# Altium PCB POD-Design-v1.1.PcbDoc (part 6 of 7)
Units mil, origin at the board's own origin, x right, y up, seen from the top; angles counter-clockwise.
Board outline 5511.81 x 3937.01 mil, 4 copper layers (Top Layer, Layer 1, Layer 2, Bottom Layer), stack 61.653 mil thick; 308 components, 227 nets, 905 pads, 367 vias.
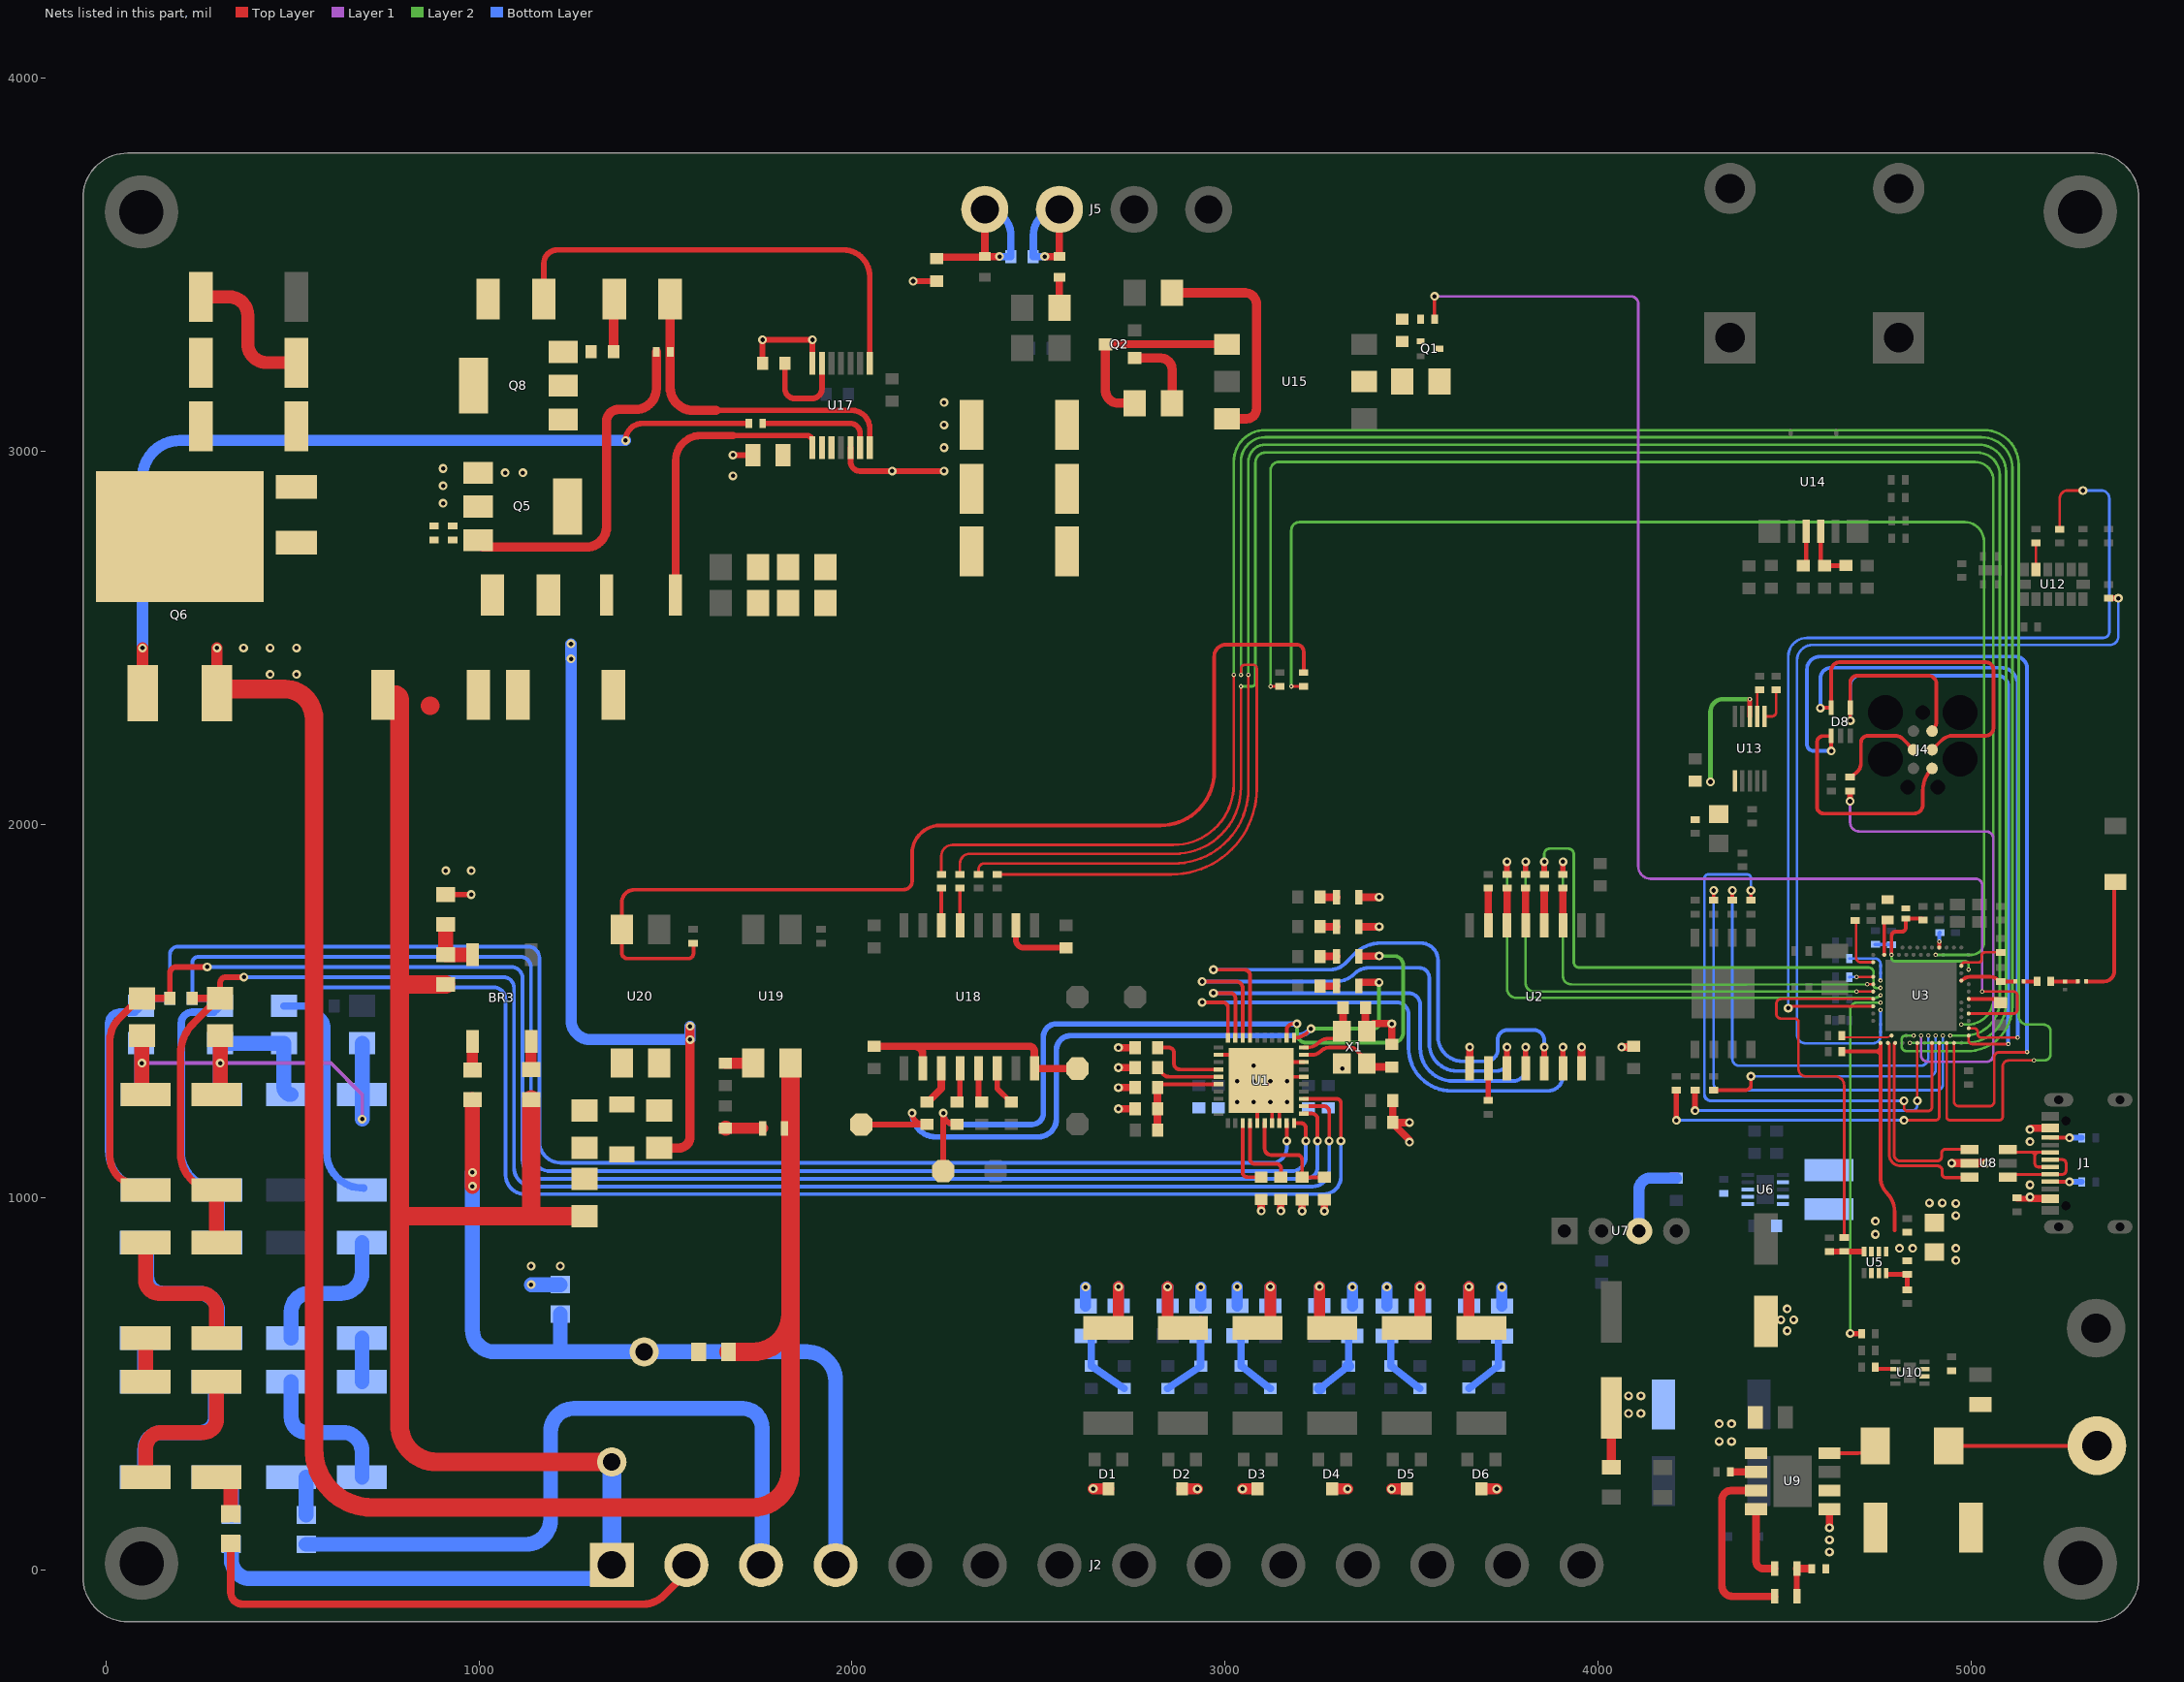
[diagram p5: the nets of this part, all layers, seen from the top]

## Via types
v1: diameter 23.62, hole 11.81, Top Layer to Bottom Layer, tented both sides, 332 vias
v2: diameter 11.81, hole 5.91, Top Layer to Bottom Layer, tented both sides, 34 vias
v3: diameter 15.75, hole 5.91, Top Layer to Bottom Layer, tented both sides, 1 vias

## Nets (pads, with @x,y where several pads share a name; then routed paths per layer and width w, separated by ;. In a path a pad name is that pad's centre, name@x,y a point inside that pad or via, vN(x,y) a via of type N, cw(c..) or ccw(c..) an arc to the next point about the centre after c; other vN are vias at no path point) (continued)
INN1: R25.1 U1.14 | length 217.2
  Top Layer w10: U1.14@3066.97,1199.03 3066.97,1102.44 ccw(c3079.41,1102.44) 3079.41,1090 3138.52,1090 cw(c3138.52,1078.62) 3149.9,1078.62 R25.1@3149.9,1054.5
INP1: R24.2 U1.13 | length 188.7
  Top Layer w10: U1.13@3047.29,1199.03 3047.29,1067.13 ccw(c3059.92,1067.13) 3059.92,1054.5 R24.2@3096.91,1054.5
IRQ0: R166.2 U18.14 | length 99.6
  Top Layer w10: U18.14@2239.49,1729.37 R166.2@2239.49,1828.94
IRQ0_1: LED3.2 R162.1 TP3.1 U1.31 | length 1985.3
  Top Layer w10: U1.31@3185.08,1427.97 ccw(c3185.08,1478.81) 3221.01,1442.85 v1(3230.67,1452.51) ; LED3.2@3358.52,1566.75 LED3.2@3359.39,1567.62
  Top Layer w15: TP3.1@2025,1195.67 R162.1@2200.78,1195.67 ; v1(2161.29,1226.18) ccw(c2191.29,1226.18) 2191.29,1196.18 R162.1@2201.3,1196.18
  Top Layer w20: LED3.2@3361.31,1576.54 v1(3412.74,1576.54)
  Layer 2 w10: v1(3230.67,1452.51) 3399.28,1452.51 ccw(c3399.28,1465.96) 3412.74,1465.96 v1(3412.74,1576.54)
  Bottom Layer w15: v1(2161.29,1226.18) ccw(c2225.22,1226.18) 2225.22,1162.25 2499.55,1162.25 ccw(c2499.55,1210.7) 2548,1210.7 2548,1395 cw(c2587,1395) 2587,1434 3193.44,1434 ccw(c3193.44,1479.19) 3225.39,1447.23 v1(3230.67,1452.51)
IRQ1: R167.2 U18.13 | length 99.6
  Top Layer w10: U18.13@2289.49,1729.37 R167.2@2289.49,1828.94
IRQ1_1: LED4.2 R163.1 TP4.1 U1.32 | length 2140.3
  Top Layer w10: U1.32@3165.4,1427.97 3165.4,1449.02 cw(c3181.67,1449.02) 3181.67,1465.3 v1(3192.71,1465.3) ; LED4.2@3358.52,1646.17 LED4.2@3359.4,1647.04
  Top Layer w15: TP4.1@2222.3,1071.18 ccw(c2222.3,1093.68) 2244.8,1093.68 v1(2244.8,1226.18) ccw(c2274.8,1226.18) 2274.8,1196.18 R163.1@2281.76,1196.18
  Top Layer w20: LED4.2@3359.4,1647.04 v1(3413.17,1647.04)
  Layer 2 w10: v1(3192.71,1465.3) 3192.71,1439.99 ccw(c3217.61,1439.99) 3217.61,1415.1 3450.63,1415.1 ccw(c3450.63,1442.06) 3477.59,1442.06 3477.59,1623.23 ccw(c3453.78,1623.23) 3453.78,1647.04 v1(3413.17,1647.04)
  Bottom Layer w15: v1(2244.8,1226.18) ccw(c2275.31,1226.18) 2275.31,1195.67 2482.48,1195.67 ccw(c2482.48,1226.18) 2513,1226.18 2513,1430.08 cw(c2548.21,1430.08) 2548.21,1465.3 v1(3192.71,1465.3)
L1_1000_CT_1: C100.2 FB8.2 J5.3 | length 363.5
  Top Layer w20: v1(2516.79,3522) FB8.2@2556.1,3522 J5.3@2556.1,3648.79
  Bottom Layer w20: v1(2516.79,3522) C100.2@2486.1,3522 2486.1,3578.79 cw(c2556.1,3578.79) J5.3@2556.1,3648.79
L1_1000_CT_2: C99.2 C100.1 FB7.2 J5.4 | length 493.2
  Top Layer w20: C99.2@2227.09,3516.32 2231.61,3520.83 FB7.2@2354.93,3520.83 ; J5.4@2356.1,3648.79 FB7.2@2356.1,3522 v1(2395.41,3522)
  Bottom Layer w20: J5.4@2356.1,3648.79 cw(c2356.1,3578.79) 2426.1,3578.79 C100.1@2426.1,3522 v1(2395.41,3522)
MISO: U1.38 U2.11 | length 1422.8
  Top Layer w10: v1(2938.72,1578.73) 3030.38,1578.73 cw(c3030.38,1561.82) 3047.29,1561.82 U1.38@3047.29,1427.97 ; U2.11@3755.75,1345.33 U2.11@3755.93,1345.51
  Top Layer w15: U2.11@3755.93,1345.51 v1(3755.93,1402.98)
  Bottom Layer w10: v1(2938.72,1578.73) 3296.79,1578.73 ccw(c3296.79,1649.97) 3347.17,1599.59 cw(c3386.21,1560.55) 3386.21,1615.76 3520.59,1615.76 cw(c3520.59,1588.74) 3547.62,1588.74 3547.62,1413.58 ccw(c3622.2,1413.58) 3622.2,1339 3729.93,1339 ccw(c3729.93,1364.81) 3755.75,1364.81 ; 3755.93,1364.81 v1(3755.93,1402.98)
MOSI: U1.39 U2.12 | length 1328.2
  Top Layer w10: v1(2968.94,1547.73) 3015.2,1547.73 cw(c3015.2,1535.33) 3027.6,1535.33 U1.39@3027.6,1427.97
  Top Layer w15: U2.12@3805.93,1345.51 v1(3805.93,1402.98)
  Bottom Layer w10: v1(2968.94,1547.73) 3491.44,1547.73 cw(c3491.44,1515.77) 3523.4,1515.77 3523.4,1400.39 ccw(c3611.79,1400.39) 3611.79,1312 3772.42,1312 ccw(c3772.42,1345.51) 3805.93,1345.51 v1(3805.93,1402.98)
NetANT1_1: ANT1.1 L4.2 | length 332.6
  Top Layer w10: L4.2@5308.14,1578.88 5355.88,1578.88 ccw(c5355.88,1607) 5384,1607 5384,1843.02 cw(c5387,1843.02) ANT1.1@5387,1846.02
NetBR3_2: BR3.2 R134.2 R135.2 | length 144.7
  Top Layer w40: R134.2@911,1650.81 R135.2@911,1732 ; R134.2@916,1650.81 916.6,1650.21 BR3.2@979.25,1650.21
NetBR3_3: BR3.3 R133.2 | length 76.5
  Top Layer w30: R133.2@982.52,1342.06 BR3.3@982.52,1418.52
NetBR3_4: BR3.4 R132.2 | length 75.9
  Top Layer w30: R132.2@1140,1342.67 BR3.4@1140,1418.52
NetC1_2: C1.2 R1.2 R2.1 | length 187.4
  Bottom Layer w20: C1.2@2641.16,628.79 2641.17,618.79 2641.17,553.28 R1.2@2641.17,548.28 2648.67,543.28 2722.08,493.28 R2.1@2729.58,488.28
NetC3_1: C3.1 R5.2 R6.1 | length 187.4
  Bottom Layer w20: R6.1@2846.16,487.77 2853.66,492.77 2927.08,542.76 R5.2@2934.58,547.76 2934.58,552.76 2934.58,618.28 C3.1@2934.58,628.28
NetC5_2: C5.2 R9.2 R10.1 | length 184.1
  Bottom Layer w20: C5.2@3033.16,629.41 3043.16,619.41 R9.2@3043.16,548.27 3050.66,543.27 3114.08,493.28 R10.1@3121.58,488.28
NetC7_1: C7.1 R13.2 R14.1 | length 180.3
  Bottom Layer w20: R14.1@3255.67,488.28 R13.2@3329.07,547.25 ; R13.2@3331.57,547.25 C7.1@3331.57,628.39
  Bottom Layer w30: R14.1@3253.17,488.28 R14.1@3255.67,488.28 ; R13.2@3329.07,547.25 R13.2@3331.57,547.25
NetC9_2: C9.2 U1.30 X1.3 | length 176.4
  Top Layer w10: U1.30@3210.97,1402.08 3221.28,1402.08 ccw(c3221.28,1441.92) 3249.45,1413.75 cw(c3278.87,1384.33) 3278.87,1425.94 X1.3@3306.36,1425.94 ; X1.3@3313.03,1445.71 ccw(c3313.03,1449.17) 3316.5,1449.17 X1.3@3313.03,1445.71
  Top Layer w20: X1.3@3316.5,1449.17 C9.2@3316.5,1513.5
NetC10_2: C10.2 U1.29 X1.1 | length 236.6
  Top Layer w10: U1.29@3210.97,1382.4 3233.48,1382.4 ccw(c3233.48,1415.69) 3257.02,1392.15 ; 3257.04,1392.18 cw(c3280.56,1368.62) 3280.56,1401.9 3334.3,1401.9 cw(c3334.3,1375.9) 3352.69,1394.28 X1.1@3363.48,1383.49 ; X1.1@3379.96,1359.09 ccw(c3389.14,1359.09) X1.1@3389.14,1349.91
  Top Layer w20: X1.1@3389.14,1349.91 C10.2@3447.1,1349.91
NetC11_2: C11.2 R15.2 R16.1 | length 179.9
  Bottom Layer w20: C11.2@3444.17,629.42 R15.2@3444.17,548.28 3451.67,543.28 3515.08,493.28 R16.1@3522.58,488.28
NetC13_1: C13.1 R19.2 R20.1 | length 179.3
  Bottom Layer w20: R20.1@3654.16,488.79 3661.66,493.79 3725.08,542.76 R19.2@3732.58,547.76 C13.1@3732.58,628.9
NetC35_2: C35.2 C36.2 C44.1 L1.2 U3.B5 U3.E24 | length 483.6
  Top Layer w10: v2(4786.87,1650.41) 4786.87,1701.68 cw(c4797.46,1701.68) 4797.46,1712.26 4813.78,1712.26 ccw(c4813.78,1723.57) 4825.09,1723.57 L1.2@4825.09,1747.22 4868.04,1747.22 cw(c4868.04,1743.63) C35.2@4871.63,1743.63
  Layer 2 w7: v2(4786.87,1650.41) 4786.87,1641.46 ccw(c4794.94,1641.46) 4794.94,1633.39 4983.66,1633.39 cw(c4983.66,1623.48) 4993.57,1623.48 v2(4993.57,1611.04)
  Bottom Layer w10: C36.2@4743.6,1678.2 4786.87,1678.2 C44.1@4786.87,1677.5 v2(4786.87,1650.41)
NetC37_1: C37.1 U3.A18 | length 40.9
  Top Layer w10: U3.A18@4914.83,1670.09 v2(4914.83,1686.01)
  Bottom Layer w10: v2(4914.83,1686.01) 4914.83,1708.3 cw(c4916.57,1708.3) C37.1@4916.57,1710.05
NetC42_1: C42.1 U3.D23 | length 130.7
  Top Layer w7: U3.D23@4973.88,1620.88 cw(c4982.95,1620.88) 4982.95,1629.95 5020.05,1629.95 ccw(c5020.05,1638.37) 5028.46,1638.37 5028.46,1648.59 cw(c5036.88,1648.59) 5036.88,1657.01 C42.1@5079.62,1657.01
NetC43_2: C43.2 U3.C1 | length 152.4
  Top Layer w7: C43.2@4692,1742.5 4692,1642.46 ccw(c4703.73,1642.46) 4703.73,1630.72 U3.C1@4737.66,1630.72
NetC45_1: C45.1 L3.2 | length 36.4
  Top Layer w10: L3.2@5140.63,1578.87 C45.1@5176.99,1578.87
NetC45_2: C45.2 L4.1 L5.2 | length 72.5
  Top Layer w10: C45.2@5213.99,1578.87 L4.1@5286.49,1578.88
NetC48_2: C48.2 L3.1 U3.H23 | length 151.6
  Top Layer w10: U3.H23@4973.88,1581.51 4982.94,1587.51 ccw(c4973.88,1601.2) 4983.63,1588 cw(c4989.54,1579.92) 4986.06,1589.3 cw(c4997.68,1557.71) 4997.68,1591.37 5051.59,1591.37 cw(c5051.59,1562.35) 5072.11,1582.87 5076.11,1578.87 C48.2@5079.61,1578.87 L3.1@5118.98,1578.87
NetC49_2: C49.2 U3.N24 | length 89.2
  Top Layer w10: U3.N24@4993.57,1532.3 5074.07,1532.3 cw(c5074.07,1526.76) C49.2@5079.61,1526.76
NetC51_2: C51.2 U3.AC5 | length 136.2
  Top Layer w5: C51.2@4653.5,1433.87 4657.66,1429.72 4775.26,1429.72 ccw(c4775.26,1443.91) 4785.3,1433.87 U3.AC5@4786.87,1433.87
NetC60_2: C60.2 U6.6 U6.7 U6.8
NetC69_2: C69.2 C70.2 FB6.1 U13.1 U13.8 | length 359
  Top Layer w12: U13.8@4406.71,2289.37 v2(4406.71,2335.72)
  Layer 2 w12: v1(4301.42,2114.02) 4301.42,2302.36 cw(c4334.78,2302.36) 4334.78,2335.72 v2(4406.71,2335.72)
NetC72_1: C72.1 R84.2 R85.2 | length 158.7
  Top Layer w25: R84.2@4035.43,276.85 C72.1@4035.43,435.51
  other v1: 4081.76,421 4115,421 4081.76,468.24 4115,468.24
NetC75_2: C75.2 U14.3 | length 95.4
  Top Layer w10: C75.2@4549.67,2693.59 C75.2@4557.91,2701.83
  Top Layer w12: C75.2@4557.91,2701.83 U14.3@4557.91,2785.6
NetC77_2: C77.2 R88.2 U14.4 | length 152.3
  Top Layer w10: C77.2@4597.28,2702.11 ccw(c4613.04,2702.11) C77.2@4601.89,2690.96 ; C77.2@4607.98,2693.58 C77.2@4608.02,2693.62
  Top Layer w12: C77.2@4597.28,2702.11 U14.4@4597.28,2785.6 ; C77.2@4608.02,2693.62 R88.2@4664.35,2693.62
NetC103_2: C103.2 U17.6 | length 267.4
  Top Layer w15: C103.2@1821.49,3234.36 ccw(c1820,3234.36) C103.2@1820,3235.85 1820,3168.37 ccw(c1846.8,3168.37) 1846.8,3141.57 1892.68,3141.57 ccw(c1892.68,3168.37) 1919.48,3168.37 U17.6@1919.48,3235.85
NetC104_2: C104.2 R158.1 R171.1 U17.9 U17.10
NetD11_1: D11.1 Q6.2
NetD11_2: D11.2 R146.2
NetD16_1: D16.1 D17.1 Q8.2 Q8.4
NetD18_1: D18.1 R141.1 | length 142.5
  Top Layer w20: D18.1@1361,3406.28 cw(c1362.86,3406.28) D18.1@1362.86,3408.14
  Top Layer w25: R141.1@1361,3266.69 D18.1@1361,3406.28
NetD19_1: D19.1 R176.1 R177.1
NetD19_2: D19.2 R178.1 U20.2
NetFB1_2: FB1.2 R30.1 | length 101.3
  Bottom Layer w40: FB1.2@336.39,148.82 R30.1@336.39,250.08
NetFB2_2: FB2.2 R36.1 | length 101.4
  Top Layer w15: R36.1@296.39,250.08 cw(c296.39,244.89) R36.1@301.58,244.89
  Top Layer w40: FB2.2@334.58,151.68 R36.1@334.58,244.89
NetFB3_2: FB3.2 R42.1 | length 101.3
  Bottom Layer w40: FB3.2@536.52,148.82 R42.1@536.52,250.08
NetFB8_1: FB8.1 R137.2 | length 82
  Top Layer w20: R137.2@2556.1,3384.93 FB8.1@2556.1,3466.89
NetJ4_3: J4.3 R91.1 | length 270.9
  Top Layer w10: R91.1@4675.62,2126.62 4683.12,2130.62 4695.11,2141.38 ccw(c4675.62,2163.13) 4704.83,2163.13 4704.83,2219.18 cw(c4723.37,2219.18) 4723.37,2237.73 4796,2237.73 cw(c4796,2208.72) 4816.51,2229.23 J4.3@4845.61,2200.13
NetL1_1: L1.1 L2.2
NetL2_1: L2.1 U3.B3 | length 97
  Top Layer w10: U3.B3@4767.19,1650.41 4767.19,1734.42 L2.1@4776.4,1743.63
NetL6_1: L6.1 U6.4
NetL6_2: L6.2 U6.2
NetL7_1: L7.1 U9.8 | length 128.3
  Top Layer w10: U9.8@4620.33,314.41 4696.14,314.41 ccw(c4696.14,381.21) L7.1@4743.38,333.98
NetLED1_1: LED1.1 R26.1 | length 44.9
  Top Layer w20: R26.1@3254.56,1725.58 LED1.1@3299.47,1725.58
NetLED2_1: LED2.1 R27.1 | length 44.9
  Top Layer w20: R27.1@3254.56,1804.99 LED2.1@3299.47,1805
NetLED3_1: LED3.1 R28.1 | length 44.9
  Top Layer w20: R28.1@3254.56,1566.75 LED3.1@3299.47,1566.75
NetLED4_1: LED4.1 R29.1 | length 44.9
  Top Layer w20: R29.1@3254.56,1646.16 LED4.1@3299.47,1646.17
NetLED5_1: LED5.1 LED6.1 R73.2 | length 108.3
  Top Layer w15: LED5.1@4532.78,-69.32 LED6.1@4532.78,5
  Top Layer w20: LED6.1@4532.78,5 R73.2@4566.75,5
NetLED5_2: LED5.2 U9.3 | length 493.8
  Top Layer w20: U9.3@4423.68,214.41 4356.95,214.41 ccw(c4356.95,189.67) 4332.21,189.67 4332.21,-40.74 ccw(c4360.79,-40.74) 4360.79,-69.32 LED5.2@4473.73,-69.32
NetLED6_2: LED6.2 U9.4 | length 201
  Top Layer w20: U9.4@4423.68,164.41 4423.68,24.69 ccw(c4443.37,24.69) 4443.37,5 LED6.2@4473.73,5
NetLED7_1: LED7.1 R173.2 | length 99.7
  Top Layer w30: R173.2@1661.5,1185.15 LED7.1@1760.47,1185.15
  Top Layer w40: R173.2@1660.99,1185.66 R173.2@1661.5,1185.15
NetQ1_1: Q1.1 R98.1
NetQ1_3: Q1.3 R100.1
NetQ2_1: Q2.1 R101.2 R102.1 | length 208
  Top Layer w25: Q2.1@2758,3249.84 2828,3249.84 cw(c2828,3219.84) 2858,3219.84 R101.2@2858,3129
NetQ2_3: Q2.3 R101.1 U15.4 | length 547.4
  Top Layer w20: Q2.3@2679.26,3287.25 U15.4@3004.91,3287.25
  Top Layer w25: Q2.3@2679.26,3287.25 2679.26,3164.52 ccw(c2714.78,3164.52) 2714.78,3129 R101.1@2758,3129
NetQ5_2: Q5.2 Q5.4 Q8.1
NetQ6_1: Q6.1 R147.2 | length 2284.5
  Top Layer w15: v1(1393,3029) cw(c1439,3029) 1439,3075 R147.2@1723.5,3075
  Top Layer w30: Q6.1@98,2353.34 v1(98,2473)
  Bottom Layer w30: v1(98,2473) 98,2929 cw(c198,2929) 198,3029 v1(1393,3029)
NetR7_2: R7.2 U1.4 | length 208.7
  Top Layer w10: R7.2@2819.01,1401.7 2849.29,1401.7 cw(c2849.29,1388.04) 2862.95,1388.04 2862.95,1359.58 ccw(c2879.49,1359.58) 2879.49,1343.03 U1.4@2982.03,1343.03
NetR8_2: R8.2 U1.5 | length 173.3
  Top Layer w10: R8.2@2819.01,1348.16 2829.01,1335.66 2831.61,1332.47 ccw(c2850.84,1348.16) 2850.84,1323.34 U1.5@2982.03,1323.34
NetR21_2: R21.2 U2.7 | length 97.6
  Top Layer w20: U2.7@3705.93,1729.37 R21.2@3705.93,1826.98
NetR22_1: R22.1 U2.10 | length 85.6
  Top Layer w15: R22.1@3705.93,1259.94 U2.10@3705.93,1345.51
NetR30_2: R30.2 R31.1 | length 408.8
  Bottom Layer w40: R31.1@103.99,250.08 103.99,324.42 cw(c149.57,324.42) 149.57,370 253.02,370 ccw(c253.02,410.96) 293.99,410.96 R30.2@293.99,505.99
NetR31_2: R31.2 R32.1 | length 117.1
  Bottom Layer w40: R31.2@103.99,505.99 R32.1@103.99,623.05
NetR32_2: R32.2 R33.1 | length 405.6
  Bottom Layer w40: R32.2@109.37,878.96 109.37,787.94 ccw(c154.34,787.94) 154.34,742.97 250.38,742.97 cw(c250.38,693.99) 299.37,693.99 R33.1@299.37,623.05
NetR36_2: R36.2 R37.1 | length 412.2
  Top Layer w40: R37.1@106.39,250.08 106.39,326.39 cw(c150,326.39) 150,370 261.39,370 ccw(c261.39,405) 296.39,405 R36.2@296.39,505.99
NetR37_2: R37.2 R38.1 | length 117.1
  Top Layer w40: R37.2@106.39,505.99 R38.1@106.39,623.05
NetR38_2: R38.2 R39.1 | length 412.2
  Top Layer w40: R38.2@106.39,878.96 106.39,777.97 ccw(c141.39,777.97) 141.39,742.97 252.78,742.97 cw(c252.78,699.36) 296.39,699.36 R39.1@296.39,623.05
NetR42_2: R42.2 R43.1 | length 405.7
  Bottom Layer w40: R42.2@496.52,505.99 496.52,411.54 ccw(c538.06,411.54) 538.06,370 634.5,370 cw(c634.5,317.98) 686.52,317.98 R43.1@686.52,250.08
NetR43_2: R43.2 R44.1 | length 117.1
  Bottom Layer w40: R43.2@686.52,505.99 R44.1@686.52,623.05
NetR44_2: R44.2 R45.1 | length 400.6
  Bottom Layer w40: R45.1@496.52,623.05 496.52,693.99 cw(c545.5,693.99) 545.5,742.97 629.97,742.97 ccw(c629.97,799.52) 686.52,799.52 R44.2@686.52,878.96
NetR68_1: R68.1 R69.2 U5.4 | length 99.8
  Top Layer w9: U5.4@4772.53,797.3 4772.53,795.53 U5.4@4774.33,793.74
  Top Layer w12: U5.4@4774.33,793.74 R68.1@4828.83,793.74 R69.2@4828.82,752.74
NetR74_1: R74.1 U9.6
NetR75_2: R75.2 U9.2 | length 64.2
  Top Layer w20: R75.2@4359.44,264.41 U9.2@4423.68,264.41
NetR77_2: R77.2 U10.6 | length 53.7
  Top Layer w10: R77.2@4743.38,540.15 U10.6@4797.05,540.15
NetR80_2: R80.2 U12.12 | length 71.5
  Top Layer w7: U12.12@5174.02,2683.11 R80.2@5174.02,2754.64
NetR81_2: R81.2 U13.6 | length 96.9
  Top Layer w7: U13.6@4446.08,2289.37 4465.13,2289.37 ccw(c4465.13,2302.07) 4477.83,2302.07 R81.2@4477.83,2359.93
NetR83_2: R83.2 U13.7 | length 71.3
  Top Layer w7: U13.7@4426.39,2289.37 R83.2@4426.39,2360.69
NetR99_1: R99.1 U15.6 | length 619
  Top Layer w25: R99.1@2858,3425 3054.03,3425 cw(c3054.03,3394.7) 3084.33,3394.7 3084.33,3114.03 cw(c3057.54,3114.03) 3057.54,3087.25 U15.6@3004.91,3087.25
NetR100_2: R100.2 U15.2
NetR102_2: R102.2 R103.1
NetR103_2: R103.2 R104.1
NetR139_2: R139.2 R140.1
NetR144_2: R144.2 R145.1 | length 389.3
  Top Layer w35: R144.2@254.48,3414 330.48,3414 cw(c330.48,3364.13) 380.36,3364.13 380.36,3288.67 ccw(c431.02,3288.67) 431.02,3238 509.38,3238 cw(c509.38,3237) R145.1@510.38,3237
NetR145_2: R145.2 R146.1
NetR147_1: R147.1 U17.13 | length 314.9
  Top Layer w15: R147.1@1760.5,3075 1994.84,3075 cw(c1994.84,3048) 2021.84,3048 U17.13@2021.84,3009.86
NetR158_2: R158.2 R170.1
NetR161_2: R161.2 U18.10 | length 186.2
  Top Layer w15: U18.10@2439.49,1729.37 2439.49,1689.9 ccw(c2460.01,1689.9) 2460.01,1669.37 R161.2@2574.49,1669.37
NetR162_2: R162.2 U18.3 | length 106.6
  Top Layer w20: R162.2@2201.3,1256.18 2203.8,1256.18 2239.49,1291.87 U18.3@2239.49,1345.51
NetR163_2: R163.2 U18.4 | length 92.7
  Top Layer w15: R163.2@2281.76,1256.18 2281.99,1256.18 2289.49,1263.68 U18.4@2289.49,1345.51
NetR164_2: R164.2 U18.5 | length 92.7
  Top Layer w15: U18.5@2339.49,1345.51 2339.49,1263.68 2346.99,1256.18 R164.2@2347.22,1256.18
NetR165_2: R165.2 U18.6 | length 106.6
  Top Layer w15: U18.6@2389.49,1345.51 2389.49,1291.87 2425.17,1256.18 R165.2@2427.67,1256.18
NetR171_2: R171.2 R172.1
NetR174_2: R174.2 U19.1 | length 74
  Top Layer w30: R174.2@1660.99,1360.28 U19.1@1735,1360.28
NetR177_2: R177.2 U20.1
NEUTRAL: FB4.1 J2.4 R133.1 R138.1 RV3.1 | length 2301
  Top Layer w40: v1(982.52,1030) v1(982.52,1067) R133.1@982.52,1262.06
  Bottom Layer w40: v1(982.52,1067) v1(982.52,1030) 982.52,644.48 ccw(c1040.8,644.48) 1040.8,586.2 1218.08,586.2 ; FB4.1@1218.08,687.6 1218.08,586.2 ; J2.4@1956.1,14.82 1956.1,508.92 ccw(c1878.83,508.92) 1878.83,586.2 RV3.1@1442.72,586.2 1218.08,586.2
NGND: C1.1 C2.1 C3.2 C4.2 C5.1 C6.1 C7.2 C8.2 C9.1 C10.1 C11.1 C12.1 C13.2 C14.2 C16.1 C17.1 C18.1 C19.1 C20.1 C21.1 C22.1 C23.1 C24.1 C25.1 C27.1 C28.1 C30.1 C31.1 C33.1 C34.1 C62.1 C111.1 D1.3 D2.3 D3.3 D4.3 D5.3 D6.3 FB4.2 LED1.2 LED2.2 R3.1 R4.2 R7.1 R8.1 R11.1 R12.2 R17.1 R18.2 R24.1 R25.2 R34.1 R35.1 R40.1 R41.1 R46.1 R47.1 SB1.1 TP9.1 U1.2 U1.15 U1.17 U1.18 U1.26 U1.28 U1.41 U2.9 U2.15 U7.3 U18.2 U18.8 X1.2 X1.4 | length 6108.4
  Top Layer w10: U1.2@2982.03,1382.4 3027.6,1382.4 cw(c3027.6,1313.5) U1.41@3096.5,1313.5 ; U1.41@3082.12,1287.44 cw(c3082.12,1282.9) 3086.66,1282.9 U1.15@3086.66,1199.03 ; U1.17@3126.03,1199.03 3126.03,1261.53 cw(c3128.36,1261.53) U1.41@3128.36,1263.86 ; U1.18@3145.71,1199.03 U1.41@3145.71,1264.29 ; U1.26@3210.97,1323.34 3106.34,1323.34 ccw(c3106.34,1313.5) U1.41@3096.5,1313.5 ; U1.28@3210.97,1362.71 3145.71,1362.71 ccw(c3145.71,1313.5) U1.41@3096.5,1313.5
  Top Layer w20: C111.1@2059.49,1405.51 2167.33,1405.51 ; U18.2@2189.49,1345.51 2189.49,1383.36 ccw(c2167.33,1383.36) 2167.33,1405.51 ; TP9.1@2604.49,1345.51 U18.8@2489.49,1345.51 2489,1345.51 2489,1391 ccw(c2474.49,1391) 2474.49,1405.51 2167.33,1405.51 ; v1(2714.35,1237.5) SB1.1@2759.01,1237.5 ; v1(2714.35,1294.62) C17.1@2759.01,1294.62 ; v1(2714.35,1348.16) R8.1@2759.01,1348.16 ; v1(2714.35,1401.7) R7.1@2759.01,1401.7 ; v1@3096.91,964 R24.1@3096.91,994.5 ; v1@3149.9,964 R25.2@3149.9,994.5 ; v1@3206.56,963.53 C22.1@3206.56,994.03 ; v1(3266.56,963.53) C23.1@3266.56,994.03 cw(c3266.56,992.61) C23.1@3267.98,992.61 ; X1.4@3313.03,1359.09 3313.03,1346.51 v1(3313.98,1345.56) ; LED1.2@3358.52,1725.58 v1(3413.17,1725.58) ; LED2.2@3358.52,1805 v1(3413.17,1804.99) ; C9.1@3376.5,1508.5 3376.5,1449.17 ccw(c3379.96,1449.17) X1.2@3379.96,1445.71 ; X1.2@3379.96,1447.38 3398.54,1465.96 v1@3446.53,1465.96 ; C10.1@3447.1,1409.91 v1(3447.1,1465.39) ; C21.1@3449.99,1200.65 v1(3494.47,1200.65) ; C20.1@3450,1260 3450,1204.57 3454.99,1199.57 3454.99,1193.15 3493.78,1154.36 3493.78,1149 v1(3494.47,1148.31) ; U2.9@3655.93,1345.51 3656,1345.51 v1(3656,1402.98) ; U2.15@3955.93,1345.51 3955.93,1402.98 v1(3956,1402.98) ; v1(4063.21,1402.81) 4063.9,1403.5 4093.5,1403.5 C16.1@4095,1405
  Top Layer w30: v1(2646.77,219.07) 2646.93,218.91 D1.3@2687.58,218.91 D1.3@2687.74,218.75 ; R3.1@2687.58,650.58 2698.09,650.58 2714.58,667.07 v1(2714.58,760.63) ; v1(2846.17,760.63) 2846.17,667.07 2862.67,650.58 R4.2@2887.58,650.58 2918.08,650.58 R4.2@2934.58,667.07 ; D2.3@2885.01,219.07 D2.3@2885.17,218.91 2925.82,218.91 v1(2925.98,218.75) ; v1(3046.76,218.75) 3046.92,218.91 D3.3@3087.58,218.91 D3.3@3087.74,219.07 ; R11.1@3087.58,650.58 3105.09,650.58 3121.58,667.07 v1(3121.58,760.63) ; v1(3253.17,761.26) 3253.17,667.07 3269.67,650.58 R12.2@3287.58,650.58 ; D4.3@3287.41,219.06 D4.3@3287.57,218.9 3328.22,218.9 v1(3328.38,218.74) ; v1(3446.77,218.75) 3446.93,218.91 D5.3@3487.58,218.91 D5.3@3487.74,219.07 ; R17.1@3487.58,650.58 3506.08,650.58 3522.58,667.07 v1(3522.58,760.63) ; v1(3654.17,760.63) 3654.17,667.07 3670.67,650.58 R18.2@3687.58,650.58 ; D6.3@3687.41,219.07 D6.3@3687.57,218.91 3728.22,218.91 v1(3728.38,218.75)
  Top Layer w40: C31.1@96.39,1433.71 v1(96.39,1360) 96.39,1285.95 ccw(c106.39,1285.95) R41.1@106.39,1275.95 ; R40.1@296.39,1275.95 ccw(c296.39,1280.95) R40.1@301.39,1280.95 ; C30.1@301.39,1428.88 cw(c306.39,1428.88) C30.1@306.39,1433.88 ; R40.1@306.39,1280.95 v1(306.39,1360) C30.1@306.39,1428.88
  Layer 1 w10: v1(96.39,1360) v1(306.39,1360) 602.94,1360 687.07,1275.87 v1(687.07,1210)
  Bottom Layer w30: C1.1@2626.16,708.79 v1(2626.16,760) ; C2.1@2714.58,709.42 v1(2714.58,760.63) ; C4.2@2846.17,709.42 v1(2846.17,760.63) ; C3.2@2934.58,708.79 v1(2934.58,760) ; C5.1@3033.16,709.41 v1(3033.16,760.63) ; C6.1@3121.58,709.42 v1(3121.58,760.63) ; C8.2@3253.17,710.05 v1(3253.17,761.26) ; C7.2@3341.58,708.79 v1(3341.58,760) ; C11.1@3434.17,708.79 v1(3434.17,760) ; C12.1@3522.58,709.42 v1(3522.58,760.63) ; C14.2@3654.17,709.42 v1(3654.17,760.63) ; C13.2@3742.58,708.28 v1(3742.58,759.49) ; U7.3@4110,910 4110,1021.77 cw(c4140,1021.77) 4140,1051.77 C62.1@4210,1051.77
  Bottom Layer w40: C28.1@96.39,1413.38 v1(96.39,1360) 96.39,1285.95 ccw(c106.39,1285.95) R35.1@106.39,1275.94 ; R34.1@299.37,1275.95 306.39,1282.97 v1(306.39,1360) C27.1@306.36,1413.38 ; C27.1@306.36,1413.38 C34.1@477.07,1413.38 477.07,1295.4 ccw(c496.52,1295.4) R46.1@496.52,1275.95 ; v1(687.07,1210) 687.07,1275.6 R47.1@686.52,1276.15 687.07,1276.69 C33.1@687.07,1413.38 ; v1(1140,766.34) FB4.2@1218.08,766.34
  other v1: 1140,816 1218.08,816 3097,964 3150,964 3206.66,963.53 3032,1256.09 3076.79,1256.09 3121.58,1256.09 3166.36,1256.09 3032,1312.18 3076.79,1312.27 3121.58,1312.18 3166.36,1312.27 3076.79,1352.8
NTRL: C99.1 C101.1 C103.1 C104.1 LED7.2 Q5.1 Q6.3 R104.2 R135.1 R138.2 R142.1 U17.7 U17.12 U19.2 | length 5990.3
  Top Layer w15: R135.1@911,1812 v1(979.25,1812) ; v1(1681,2989.86) C104.1@1735,2989.86 ; C103.1@1758.5,3237.35 ccw(c1760,3237.35) C103.1@1760,3235.85 v1(1760,3299) v1(1893.89,3299) ; U17.7@1893.89,3235.85 v1(1893.89,3299) ; 1893.89,3281.11 v1(1893.89,3299) ; U17.12@1996.25,3009.86 1996.25,2972.59 ccw(c2021.84,2972.59) 2021.84,2947 v1(2107.67,2947) v1(2247,2947) ; v1@2164,3457 v1(2164,3456.32) C99.1@2227.09,3456.32
  Top Layer w30: Q6.3@298,2306 Q6.3@298,2351.55 v1(298,2473)
  Top Layer w50: Q6.3@298,2351.55 cw(c309.45,2351.55) 309.45,2363 478.44,2363 cw(c478.44,2283.68) 557.77,2283.68 557.77,324.75 ccw(c713.52,324.75) 713.52,169 1735,169 ccw(c1735,269) 1835,269 1835,732.36 ; R138.2@1669.02,586.2 1735,586.2 ccw(c1735,686.2) 1835,686.2 1835,732.36 ; U19.2@1835,1360.28 1835,732.36
  other v1: 911,1876 979.25,1876 440,2402 511,2402 369,2473 440,2473 511,2473 904,2861 904,2907.5 1681,2934 1070,2942.69 1117.51,2942.69 904,2954 2247,3009.86 2247,3070.43 2247,3131
P0.04: R57.1 U3.J1 | length 1185.2
  Top Layer w7: v2(4721.75,1571.67) U3.J1@4737.66,1571.67
  Top Layer w15: R57.1@3905.93,1865.94 v1(3905.93,1900)
  Layer 2 w7: v1(3905.93,1900) 3905.93,1593.04 ccw(c3927.3,1593.04) 3927.3,1571.67 4251.59,1570.29 4398.41,1570.29 v2(4721.75,1571.67) v2@4721.97,1571.67
P0.05: R58.1 U3.K2 | length 1317
  Top Layer w15: R58.1@3855.93,1865.92 v1(3855.93,1900)
  Layer 2 w7: v1(3855.93,1900) 3855.93,1920.93 cw(c3870,1920.93) 3870,1935 3920,1935 cw(c3920,1920) 3935,1920 3935,1630.98 ccw(c3949.76,1630.98) 3949.76,1616.22 4725.57,1616.22 cw(c4725.57,1603.04) 4738.75,1603.04 4738.75,1569.27 ccw(c4746.83,1569.27) 4746.83,1561.18 4757.35,1561.18 v2(4757.35,1561.83)
P0.06: R59.1 U3.L1 | length 1304.3
  Top Layer w7: v2(4693.43,1551.98) U3.L1@4737.66,1551.98
  Top Layer w15: R59.1@3805.93,1865.93 v1(3805.93,1900)
  Layer 2 w7: v1(3805.93,1900) 3805.93,1574.07 ccw(c3828.02,1574.07) 3828.02,1551.98 v2(4693.43,1551.98)
P0.07: R60.1 U3.M2 | length 1391.4
  Top Layer w15: R60.1@3755.93,1865.94 v1(3755.93,1900)
  Layer 2 w7: v1(3755.93,1900) 3755.93,1560.41 ccw(c3781.21,1560.41) 3781.21,1535.13 4740.43,1535.13 ccw(c4740.43,1559.06) 4749.16,1536.78 ccw(c4746.57,1543.29) 4749.76,1537.05 cw(c4757.35,1522.46) 4751.14,1537.69 ccw(c4748.46,1544.16) 4751.71,1537.96 ccw(c4740.43,1559.06) v2(4757.35,1542.14)
P0.08: R61.1 U3.N1 | length 1047.4
  Top Layer w7: R61.1@4660,892.55 4660,1299.91 ccw(c4635.27,1299.91) 4635.27,1324.64 4556.79,1324.64 cw(c4556.79,1343.92) 4537.52,1343.92 4537.52,1469.42 ccw(c4527.29,1469.42) 4527.29,1479.64 4490,1479.64 cw(c4490,1491.64) 4478,1491.64 4478,1519.27 cw(c4491.03,1519.27) 4491.03,1532.3 U3.N1@4737.66,1532.3
P0.15: R168.1 U3.AD10 | length 5578.9
  Top Layer w7: R168.1@2339.49,1865.94 2339.49,1880.49 cw(c2354,1880.49) 2354,1895 2861.95,1895 ccw(c2861.95,2095.78) 3062.73,2095.78 v2(3062.73,2401)
  Layer 2 w7: v2(3062.73,2401) 3062.73,2972.65 cw(c3107.96,2972.65) 3107.96,3017.88 5020.3,3017.88 cw(c5020.3,2944.39) 5093.79,2944.39 5093.79,1519.99 cw(c4987.99,1519.99) 4987.99,1414.19 v2(4836.09,1414.19)
P0.16: R169.1 U3.AC11 | length 5815.5
  Top Layer w7: R169.1@2389.49,1865.94 2855.99,1865.94 ccw(c2855.99,2094.98) 3085.04,2094.98 3085.04,2418.31 ccw(c3075.43,2418.31) 3075.43,2427.91 3053.21,2427.91 ccw(c3053.21,2417.31) 3042.61,2417.31 v2(3042.61,2401)
  Layer 2 w7: v2(3042.61,2401) 3042.61,2972.65 cw(c3107.96,2972.65) 3107.96,3038 5027.48,3038 cw(c5027.48,2954.77) 5110.71,2954.77 5110.71,1513.49 cw(c4989.27,1513.49) 4989.27,1392.05 4826.92,1392.05 cw(c4826.92,1405.02) 4813.95,1405.02 4813.95,1423.36 cw(c4824.47,1423.36) 4824.47,1433.87 v2(4845.93,1433.87)
P0.17: R48.1 U3.AD12 | length 826
  Top Layer w7: v1(4855.77,1259) U3.AD12@4855.77,1414.19
  Top Layer w15: v1(4260,1233) R48.1@4260,1287.64
  Bottom Layer w7: v1(4260,1233) 4842.77,1233 ccw(c4842.77,1246) 4855.77,1246 v1(4855.77,1259)
P0.18/RESET: R91.2 U3.AC13 | length 1339.5
  Top Layer w15: v1(4675.62,2062) R91.2@4675.62,2089.62
  Layer 1 w7: v1(4675.62,2062) 4675.62,2006 ccw(c4700.62,2006) 4700.62,1981 5040.3,1981 cw(c5040.3,1961.45) 5059.85,1961.45 5059.85,1381.94 cw(c5041.64,1381.94) 5041.64,1363.73 4884.41,1363.73 cw(c4884.41,1382.53) 4865.61,1382.53 v2(4865.61,1433.87)
P0.19: R49.1 U3.AC15 | length 1085.6
  Top Layer w10: R49.1@4359.99,1796.64 v1(4360,1823)
  Bottom Layer w7: v1(4360,1823) 4360,1371.63 ccw(c4378.56,1371.63) 4378.56,1353.07 4864.65,1353.07 ccw(c4864.65,1373.71) 4885.3,1373.71 v2(4885.3,1433.87)
P0.20: R50.1 U3.AD16 | length 1629.4
  Top Layer w7: v1(4820.23,1259) 4820.23,1240.16 ccw(c4828.57,1240.16) 4828.57,1231.82 4884.86,1231.82 ccw(c4884.86,1242.1) 4895.14,1242.1 U3.AD16@4895.14,1414.19
  Top Layer w10: R50.1@4409.99,1796.64 v1(4410,1823)
  Bottom Layer w7: v1(4410,1823) 4410,1856 ccw(c4400,1856) 4400,1866 4295.56,1866 ccw(c4295.56,1855.57) 4285.13,1855.57 4285.13,1279.52 ; v1(4820.23,1259) 4305.65,1259 ; 4285.13,1279.52 ccw(c4305.65,1279.52) 4305.65,1259 ; 4285.13,1279.52 4285.13,1275.11 ccw(c4301.23,1275.11) 4301.23,1259 4305.65,1259
P0.21: R51.1 U3.AC17 | length 727.3
  Top Layer w10: R51.1@4309.99,1287.64 4396.92,1287.64 4404.13,1290.72 4408.9,1295.48 ccw(c4396.92,1300.72) 4409.99,1300.72 v1(4409.99,1324.64)
  Bottom Layer w7: v1(4409.99,1324.64) 4887.03,1324.64 ccw(c4887.03,1342.6) 4904.98,1342.6 v2(4904.98,1433.87)
P0.22: R52.1 U3.AD18 | length 988.5
  Top Layer w7: v1(4820.23,1207) 4905.22,1207 ccw(c4905.22,1216.61) 4914.83,1216.61 U3.AD18@4914.83,1414.19
  Top Layer w15: v1(4210.01,1207) R52.1@4210.01,1287.64
  Bottom Layer w7: v1(4210.01,1207) v1(4820.23,1207)
P0.23: R53.1 U3.AC19 | length 1308.4
  Top Layer w10: R53.1@4309.99,1796.64 v1(4310,1823)
  Bottom Layer w7: v1(4310,1823) 4310,1305.46 ccw(c4327.95,1305.46) 4327.95,1287.5 4908.8,1287.5 ccw(c4908.8,1303.37) 4924.67,1303.37 v2(4924.67,1433.87)
P0.24: R166.1 U3.AD20 | length 6302.3
  Top Layer w7: R166.1@2239.49,1865.94 2239.49,1915.49 cw(c2268.97,1915.49) 2268.97,1944.97 2861.33,1944.97 ccw(c2861.33,2107.19) 3023.55,2107.19 v2(3023.55,2401) ; U3.AD20@4934.51,1414.19 4934.51,1215.68 ccw(c4943.19,1215.68) 4943.19,1207 5075.18,1207 ccw(c5075.18,1216.78) 5084.96,1216.78 5084.96,1351.58 cw(c5100.7,1351.58) 5100.7,1367.32 v2(5168.99,1367.32)
  Layer 2 w7: v2(3023.55,2401) 3023.55,2972.65 cw(c3107.96,2972.65) 3107.96,3057.06 3366,3057.06 5034.58,3057.06 cw(c5034.58,2963.97) 5127.67,2963.97 5127.67,1486.79 ccw(c5151.06,1486.79) 5151.06,1463.4 5194.21,1463.4 cw(c5194.21,1444.33) 5213.28,1444.33 5213.28,1384.26 cw(c5196.34,1384.26) 5196.34,1367.32 v2(5168.99,1367.32)
P0.25: R167.1 U3.AC21 | length 5444.8
  Top Layer w7: R167.1@2289.49,1865.94 2289.49,1895 cw(c2315.9,1895) 2315.9,1921.42 2865.5,1921.42 ccw(c2865.5,2098.52) 3042.61,2098.52 v2(3042.61,2370)
  Layer 2 w7: v2(3042.61,2370) 3071.9,2370 ccw(c3071.9,2379.41) 3081.31,2379.41 3081.32,2969.96 cw(c3107.96,2969.96) 3107.96,2996.61 5016.98,2996.61 cw(c5016.98,2936.48) 5077.11,2936.48 5077.11,1527.8 cw(c4983.19,1527.8) 4983.19,1433.87 v2(4944.35,1433.87)
P0.26: R55.1 U3.G1 | length 61.6
  Top Layer w7: v2@4696.07,1591.35 U3.G1@4737.66,1591.35
  Bottom Layer w7: R55.1@4673.72,1590.37 4673.72,1590.71 v2(4693.43,1590.71)
P0.27: R56.1 U3.H2 | length 136.5
  Bottom Layer w7: R56.1@4673.72,1640.74 4742.51,1640.74 cw(c4742.51,1625.91) 4757.35,1625.91 v2(4757.35,1581.51)
P1.01: R92.1 U3.Y23 | length 4097.9
  Top Layer w7: v2(3122,2370) R92.1@3147,2370
  Layer 2 w7: v2(3122,2370) 3122,2948.84 cw(c3144.86,2948.84) 3144.86,2971.69 3345.11,2971.69 5010.01,2971.69 cw(c5010.01,2921.86) 5059.85,2921.86 5059.85,1532.55 cw(c4990.7,1532.55) 4990.7,1463.4 v2(4973.88,1463.4)
P1.04: R95.1 U3.U24 | length 3637.5
  Top Layer w7: U3.U24@4993.57,1492.93 5114.06,1492.93 ccw(c5114.06,1502.77) 5123.9,1502.77 5123.9,1542.14 ccw(c5114.06,1542.14) 5114.06,1551.98 v2(5030,1551.98)
  Top Layer w10: R95.1@3561.61,3354.68 v1(3561.61,3415.73)
  Layer 1 w7: v1(3561.61,3415.73) 4087.27,3415.73 cw(c4087.27,3395) 4108,3395 4108,1886.91 ccw(c4140.51,1886.91) 4140.51,1854.4 5012.21,1854.4 cw(c5012.21,1836.61) 5030,1836.61 v2(5030,1551.98)
P1.08: R62.1 U3.P2 | length 987.6
  Top Layer w15: v1@4676,635 R62.1@4703.44,635
  Layer 2 w7: v1(4676,635.46) 4676,1503.38 cw(c4695.08,1503.38) 4695.08,1522.46 v2(4757.35,1522.46)
P1.09: R63.1 U3.R1 | length 2662.1
  Top Layer w7: v1(4510,1507.33) cw(c4522.41,1494.91) 4522.41,1512.47 4677.06,1512.47 U3.R1@4737.66,1512.61 ; R63.1@5237.75,2791.44 5237.75,2873.87 cw(c5258.89,2873.87) 5258.89,2895 v1(5299.96,2895)
  Bottom Layer w7: v1@4510,1512.33 4510,2450 cw(c4560,2450) 4560,2500 5354.13,2500 ccw(c5354.13,2516.64) 5370.77,2516.64 5370.77,2873.41 ccw(c5349.18,2873.41) 5349.18,2895 v1(5299.96,2895)
P1.11: R64.1 U3.T2 | length 2348.2
  Top Layer w15: R64.1@5368.81,2606.35 v1(5394.73,2606.35)
  Bottom Layer w7: v2(4757.35,1502.77) 4757.35,1432.85 cw(c4737.83,1432.85) 4737.83,1413.33 4555.67,1413.33 cw(c4555.67,1435.74) 4533.26,1435.74 4533.26,2439.1 cw(c4575.16,2439.1) 4575.16,2481 5371.94,2481 ccw(c5371.94,2503.79) 5394.73,2503.79 v1(5394.73,2606.35)
P1.12: R152.1 U3.B17 | length 3574.1
  Top Layer w7: v2(3177.54,2370) R152.1@3211,2370
  Layer 2 w7: v2(3177.54,2370) 3177.54,2788.21 cw(c3199.6,2788.21) 3199.6,2810.28 4838.13,2810.28 4982.84,2810.28 cw(c4982.84,2758.5) 5034.61,2758.5 5034.61,1684.19 cw(c5000.84,1684.19) 5000.84,1650.41 v2(4904.98,1650.41)
PH_SNS: R148.2 U17.8 | length 791.1
  Top Layer w15: 1681,3042.58 1878.22,3042.58 cw(c1878.22,3026.91) 1893.32,3031.1 U17.8@1893.89,3009.86
  Top Layer w20: R148.2@1527.09,2615 1527.09,2974.37 cw(c1595.3,2974.37) 1595.3,3042.58 1681,3042.58
PTT: R95.2 R98.2
PWR_STAT: R61.2 R67.1 U5.8 | length 88.6
  Top Layer w15: R67.1@4621.87,855.17 U5.8@4710.49,855.17
REF1: C22.2 C23.2 U1.16 | length 292.5
  Top Layer w10: U1.16@3106.34,1199.03 3106.34,1131.08 ccw(c3123.57,1131.08) 3123.57,1113.84 3194.09,1113.84 cw(c3194.09,1101.37) 3206.56,1101.37 C22.2@3206.56,1054.03 C23.2@3266.56,1054.03
RESET_ADE: C17.2 R23.2 SB1.2 U1.6 | length 278.7
  Top Layer w10: R23.2@2819.01,1180.99 ccw(c2820,1180.99) R23.2@2820,1180 ; C17.2@2819.01,1294.62 ccw(c2819.96,1294.62) C17.2@2819.96,1293.66 ; C17.2@2819.96,1303.66 U1.6@2982.03,1303.66
  Top Layer w20: R23.2@2819.01,1180.99 SB1.2@2819.01,1237.5 C17.2@2819.01,1294.62
SCLK: U1.37 U2.13 | length 1608.5
  Top Layer w10: v1(2968.94,1610.45) 3052.17,1610.45 cw(c3052.17,1595.66) 3066.97,1595.66 U1.37@3066.97,1427.97
  Top Layer w12: U2.13@3855.93,1340 U2.13@3855.93,1345.51
  Top Layer w15: U2.13@3855.93,1345.51 v1(3855.93,1402.98)
  Bottom Layer w10: v1(2968.94,1610.45) 3281.47,1610.45 ccw(c3281.47,1667.03) 3321.48,1627.03 3347.17,1652.71 cw(c3417.88,1582) 3417.88,1682 3524.35,1682 cw(c3524.35,1635.35) 3571,1635.35 3571,1431.51 ccw(c3637.69,1431.51) 3637.69,1364.81 3699.58,1364.81 ccw(c3699.58,1396.23) 3731,1396.23 3731,1422.73 cw(c3756.96,1422.73) 3756.96,1448.69 3827.96,1448.69 cw(c3827.96,1420.72) 3855.93,1420.72 v1(3855.93,1402.98)
SCR-SIG-1: R152.2 R157.2 U20.4 | length 2825.3
  Top Layer w10: R157.2@1574,1681.54 cw(c1574,1680.54) 1575,1680.54 1575,1654.17 cw(c1561.19,1654.17) 1561.19,1640.36 1398.13,1640.36 cw(c1398.13,1655.48) 1383,1655.48 U20.4@1383,1718.54 1383,1791 cw(c1417,1791) 1417,1825 2138.54,1825 ccw(c2138.54,1847.44) 2160.98,1847.44 2160.98,1921.2 cw(c2237.14,1921.2) 2237.14,1997.36 2827.11,1997.36 ccw(c2827.11,2141.25) 2971,2141.25 2971,2449.95 cw(c3003,2449.95) 3003,2481.95 3192.06,2481.95 cw(c3192.06,2463.01) 3211,2463.01 R152.2@3211,2407
SCR_O: D18.2 R143.2 U17.14 | length 886.4
  Top Layer w15: 1635.97,3109.93 1999.73,3109.93 cw(c1999.73,3062.23) 2047.43,3062.23 U17.14@2047.43,3009.86
  Top Layer w25: D18.2@1512.47,3408.14 R143.2@1512.47,3266.69 1512.47,3171.42 ccw(c1573.96,3171.42) 1573.96,3109.93 1635.97,3109.93
SCR_T: D17.2 U17.1 | length 1263.6
  Top Layer w15: D17.2@1174.03,3408.14 1174.03,3504.03 cw(c1210,3504.03) 1210,3540 1976.75,3540 cw(c1976.75,3469.32) 2047.43,3469.32 U17.1@2047.43,3235.85
SL_RLY: D16.2 R140.2 R148.1 R178.2 | length 1789.5
  Top Layer w25: R178.2@1483,1132.67 1536,1132.67 ccw(c1536,1162.67) 1566,1162.67 v1(1566,1422.92) v1(1566,1458.96)
  Bottom Layer w30: v1@1246.56,2444.44 v1(1246.56,2483.93) ; v1(1247,2444) 1247,1475.36 ccw(c1299.45,1475.36) 1299.45,1422.92 v1(1566,1422.92) v1(1566,1458.96)
SPI_MISO: R60.2 U2.6 | length 97.6
  Top Layer w20: U2.6@3755.93,1729.37 R60.2@3755.93,1826.98
SPI_MOSI: R59.2 U2.5 | length 97.6
  Top Layer w20: U2.5@3805.93,1729.37 R59.2@3805.93,1826.98
SPI_SCK: R58.2 U2.4 | length 97.6
  Top Layer w20: U2.4@3855.93,1729.37 R58.2@3855.93,1826.98
SPI_SS: R57.2 U2.3 | length 97.6
  Top Layer w20: U2.3@3905.93,1729.37 R57.2@3905.93,1826.98
SS: U1.40 U2.14 | length 1462.5
  Top Layer w10: v1(2938.72,1523) 2994.13,1523 cw(c2994.13,1509.22) 3007.92,1509.22 U1.40@3007.92,1427.97 ; U2.14@3905.93,1340 U2.14@3905.93,1345.51
  Top Layer w15: U2.14@3905.93,1345.51 v1(3905.93,1402.98)
  Bottom Layer w10: v1(2938.72,1523) 3459.78,1523 cw(c3459.78,1490.72) 3492.06,1490.72 3492.06,1401.15 ccw(c3607.57,1401.15) 3607.57,1285.64 3865.53,1285.64 ccw(c3865.53,1326.25) 3906.13,1326.25 v1@3906.13,1402.98
SWDCLK: D8.5 J4.4 U3.AA24 | length 2679.4
  Top Layer w7: U3.AA24@4993.57,1453.56 5007.45,1453.56 cw(c5007.45,1443.3) 5017.71,1443.3 5017.71,1437.98 ccw(c5027.23,1437.98) 5027.23,1428.46 v2(5125,1428.46)
  Top Layer w10: v1(4596,2312) 4596,2312.53 D8.5@4625.02,2312.53 4625.02,2412.11 cw(c4647.48,2412.11) 4647.48,2434.56 5040.14,2434.56 cw(c5040.14,2414.71) 5060,2414.71 5060,2258 cw(c5039.73,2258) 5039.73,2237.73 4951.21,2237.73 ccw(c4951.21,2194.28) 4920.51,2225.03 J4.4@4895.61,2200.13
  Bottom Layer w10: v1(4596,2312) 4596,2391 cw(c4625,2391) 4625,2420 5080,2420 cw(c5080,2375) 5125,2375 v2(5125,1428.46)
SWDIO: D8.4 J4.2 U3.AC24 | length 2118.7
  Top Layer w7: U3.AC24@4993.57,1433.87 4993.57,1421.08 ccw(c5003.41,1421.08) 5003.41,1411.24 v2(5099.61,1411.24)
  Top Layer w10: v1(4676.2,2278.26) D8.4@4676.2,2312.53 4676.2,2379.19 cw(c4696.02,2379.19) 4696.02,2399 4884.66,2399 cw(c4884.66,2376.39) 4907.27,2376.39 4907.27,2278.26 cw(c4867.48,2278.26) J4.2@4895.61,2250.13
  Bottom Layer w10: v1(4676.2,2278.26) 4676.2,2373.35 cw(c4701.85,2373.35) 4701.85,2399 5071,2399 cw(c5071,2370.39) 5099.61,2370.39 v2(5099.61,1411.24)
SWO: D8.1 J4.6 U3.AD22 | length 3099.4
  Top Layer w7: U3.AD22@4954.2,1414.19 4954.2,1257.5 ccw(c4967.18,1257.5) 4967.18,1244.52 5049.38,1244.52 ccw(c5049.38,1257.55) 5062.4,1257.55 5062.4,1376.88 cw(c5074.62,1376.88) 5074.62,1389.1 5149.1,1389.1 ccw(c5149.1,1390) v2(5150,1390)
  Top Layer w10: v1(4625.02,2197) D8.1@4625.02,2237.73 cw(c4624.29,2237.73) 4624.29,2237 4604,2237 ccw(c4604,2220) 4587,2220 4587,2047 ccw(c4605,2047) 4605,2029 4847,2029 ccw(c4847,2052.61) 4870.61,2052.61 4870.61,2089.77 cw(c4955.97,2089.77) J4.6@4895.61,2150.13
  Bottom Layer w10: v1(4625.02,2197) 4578,2197 cw(c4578,2215) 4560,2215 4560,2415 cw(c4595,2415) 4595,2450 5118.69,2450 cw(c5118.69,2418.69) 5150,2418.69 v2(5150,1390)
TH_G1: Q8.3 R141.2
TH_G2: C101.2 Q5.3 R142.2 R143.1 | length 950.8
  Top Layer w25: Q5.3@997.43,2761.59 ccw(c1015.69,2761.59) 1015.69,2743.34 1287.95,2743.34 ccw(c1287.95,2797.43) 1342.05,2797.43 1342.05,3079.86 cw(c1374.38,3079.86) 1374.38,3112.19 1419.72,3112.19 ccw(c1419.72,3167.93) 1475.47,3167.93 R143.1@1475.47,3266.69
TYPEC_CC1: J1.A5 R71.1 | length 84.5
  Top Layer w10: J1.A5@5212.5,1042.29 v1@5264,1042.29
  Bottom Layer w15: v1(5264,1041.89) R71.1@5297,1041.89
TYPEC_CC2: J1.B5 R72.1 | length 84.9
  Top Layer w8: v1(5264,1160) v1@5264,1160.4
  Top Layer w10: J1.B5@5212.5,1160.4 v1@5264,1160.4
  Bottom Layer w15: v1(5264,1160) R72.1@5297,1160
TYPEC_D_N: J1.A7 J1.B7 U8.1 | length 233.6
  Top Layer w8: U8.1@5098.57,1054.1 cw(c5106.45,1054.1) 5106.45,1061.98 5244.88,1061.98 ccw(c5244.88,1071.72) 5254.62,1071.72 5254.62,1091.5 ccw(c5244.78,1091.5) 5244.78,1101.35 J1.A7@5212.5,1101.35
TYPEC_D_P: J1.A6 J1.B6 U8.3 | length 215.9
  Top Layer w8: U8.3@5098.57,1128.91 ccw(c5106.45,1128.91) 5106.45,1121.03 5180.71,1121.03 ; 5161.29,1121.03 cw(c5161.29,1111.32) 5171,1111.32 ; J1.A6@5212.5,1081.66 5180.84,1081.66 cw(c5180.84,1091.5) 5171,1091.5 5171,1111.32 ; J1.B6@5212.5,1121.03 5180.71,1121.03 ; 5171,1111.32 cw(c5180.71,1111.32) 5180.71,1121.03
TYPEC_N: U3.AD4 U8.6 | length 557.1
  Top Layer w8: U3.AD4@4777.03,1414.19 cw(c4777.03,1410.85) 4780.37,1410.85 4780.37,1115.67 ccw(c4811.54,1115.67) 4811.54,1084.5 4910.5,1084.5 cw(c4910.5,1072.3) 4922.7,1072.3 4922.7,1062.57 ccw(c4932.16,1062.57) 4932.16,1053.1 U8.6@4997.13,1053.1
TYPEC_P: U3.AD6 U8.4 | length 535
  Top Layer w8: U3.AD6@4796.72,1414.19 ccw(c4796.72,1410.85) 4793.37,1410.85 4793.37,1115.67 ccw(c4811.54,1115.67) 4811.54,1097.5 4908.8,1097.5 ccw(c4908.8,1109.71) 4921,1109.71 4921,1119.44 cw(c4930.46,1119.44) 4930.46,1128.91 U8.4@4995.43,1128.91
V-OR: C56.1 C59.2 U5.2 U5.7 U6.5
  other v1: 4507.01,642.5 4490.23,672.03 4524.79,672.03 4507.01,701.56
VA_INPUT: FB1.1 J2.1 R132.1 R134.1 R139.1 R176.2 RV3.2 | length 4905.9
  Top Layer w50: 774,2347.89 cw(c774,2334.88) 787,2334.88 787,1570.81 ; 787,2234.66 787,2234.79 ; 869.22,2317.89 869.45,2317.89 ; R134.1@911,1570.81 787,1570.81 ; R132.1@1140,1262.67 1140,950 ; R176.2@1283,950 1140,950 ; RV3.2@1356.1,291 887,291 cw(c887,391) 787,391 787,953.2 ; 787,953.2 787,1570.81 ; 787,953.2 790.2,950 1140,950
  Bottom Layer w40: FB1.1@336.39,70.08 336.39,29.08 ccw(c387.19,29.08) 387.19,-21.72 1319.56,-21.72 J2.1@1356.1,14.82
  Bottom Layer w50: J2.1@1356.1,14.82 RV3.2@1356.1,291
VA_N: C26.2 C28.2 R35.2 U1.19 | length 4459
  Top Layer w10: v1(3165.4,1151.65) U1.19@3165.4,1199.03
  Bottom Layer w10: C28.2@77.78,1496.61 ccw(c77.78,1513.38) C28.2@94.55,1513.38 ; C28.2@84.39,1523.55 C28.2@94.55,1533.71 ; C26.2@171.39,1533.72 171.39,1650.73 cw(c193.27,1650.73) 193.27,1672.62 1131.48,1672.62 cw(c1131.48,1642.21) 1161.89,1642.21 1161.89,1149.94 ccw(c1219.09,1149.94) 1219.09,1092.73 3125.31,1092.73 ccw(c3125.31,1132.82) 3165.4,1132.82 v1(3165.4,1151.65)
  Bottom Layer w20: C28.2@77.78,1496.61 36.55,1496.61 ccw(c36.55,1467.32) 7.26,1467.32 7.26,1125.12 ccw(c107.26,1125.12) R35.2@107.26,1025.12 ; C28.2@94.55,1533.71 C26.2@171.39,1533.72
VA_P: C26.1 C27.2 R33.2 R34.2 U1.20 | length 4620.5
  Top Layer w10: U1.20@3185.08,1199.03 3203.58,1199.03 cw(c3203.58,1185.94) 3216.67,1185.94 v1(3216.67,1151.65)
  Bottom Layer w10: C26.1@231.39,1533.72 231.39,1628.58 cw(c248.06,1628.58) 248.06,1645.25 1110.66,1645.25 cw(c1110.66,1616.65) 1139.26,1616.65 1139.26,1122.04 ccw(c1190.76,1122.04) 1190.76,1070.54 3178.63,1070.54 ccw(c3178.63,1108.59) 3216.67,1108.59 v1(3216.67,1151.65) ; C27.2@289.59,1496.61 ccw(c289.59,1513.38) C27.2@306.36,1513.38 ; C27.2@293.14,1526.6 C27.2@295.98,1529.45 ; C27.2@305.4,1533.72 cw(c306.36,1519.08) C27.2@306.36,1533.75
  Bottom Layer w20: C26.1@231.39,1533.72 C27.2@305.4,1533.72 ; C27.2@289.59,1496.61 231.39,1496.61 ccw(c231.39,1467.23) 202.01,1467.23 202.01,1123.42 ccw(c300.3,1123.42) R34.2@303.62,1025.18
  Bottom Layer w40: R33.2@299.37,878.96 R34.2@299.37,1020.04
VB_INPUT: FB2.1 J2.2 | length 1423.6
  Top Layer w20: FB2.1@334.58,72.94 334.58,-59.03 ccw(c365.55,-59.03) 365.55,-90 1440.95,-90 ccw(c1441.03,-15.01) 1494.01,-68.08 1556.1,-5.99 J2.2@1556.1,14.82
VB_N: C29.2 C31.2 R41.2 U1.21 | length 4545.9
  Top Layer w10: U1.21@3210.97,1224.92 3233.17,1224.92 cw(c3233.17,1210.1) 3247.99,1210.1 v1(3247.99,1151.65)
  Top Layer w15: C29.2@171.39,1533.72 171.39,1600.67 cw(c188.61,1600.67) 188.61,1617.89 v1(271.36,1617.89)
  Top Layer w20: C31.2@87.3,1531.35 33.57,1477.63 ccw(c88.9,1422.25) 10.62,1422.19 10.62,1109.67 ccw(c86.43,1109.67) 44.46,1046.54 R41.2@106.39,1020.04 ; C31.2@96.39,1533.71 C29.2@171.39,1533.72
  Bottom Layer w10: v1(271.36,1617.89) 1086.63,1617.89 cw(c1086.63,1587.88) 1116.63,1587.88 1116.63,1100.22 ccw(c1166.76,1100.22) 1166.76,1050.09 3216.61,1050.09 ccw(c3216.61,1081.47) 3247.99,1081.47 v1(3247.99,1151.65)
VB_P: C29.1 C30.2 R39.2 R40.2 U1.22 | length 4630.4
  Top Layer w10: U1.22@3210.97,1244.6 3265.14,1244.6 cw(c3265.14,1230.44) 3279.31,1230.44 v1(3279.31,1151.65)
  Top Layer w15: C30.2@306.39,1533.88 306.23,1533.88 306.23,1575.39 cw(c321.36,1575.39) 321.36,1590.53 v1(370,1590.53)
  Top Layer w20: C29.1@231.39,1533.72 C30.2@301.23,1533.72 ; R40.2@296.39,1020.04 cw(c296.39,1116.19) 200.24,1116.19 200.24,1386.31 cw(c311.94,1386.31) 232.96,1465.29 276.39,1508.73 276.39,1508.88 C30.2@301.23,1533.72 ; C30.2@306.23,1533.88 301.39,1533.88 C30.2@301.23,1533.72
  Top Layer w40: R39.2@296.39,878.96 R40.2@296.39,1020.04
  Bottom Layer w10: v1(370,1590.53) 1065.41,1590.53 cw(c1065.41,1561.93) 1094.01,1561.93 1094.01,1080.15 ccw(c1144.65,1080.15) 1144.65,1029.51 3235.19,1029.51 ccw(c3235.19,1073.62) 3279.31,1073.62 v1(3279.31,1151.65)
VBAT: C65.2 C66.2 L7.2 R74.2 TP1.1 U5.6 U10.2 U10.3 | length 397.2
  Top Layer w10: L7.2@4940.23,333.98 5335.75,333.98 ccw(c5335.75,336.13) TP1.1@5337.28,334.61
  other v1: 4743.59,901.14 4743.59,936.63
VBUS: C54.2 C64.1 FB5.2 R68.2 R70.2 R73.1 U3.AD2 U5.3 U5.5 U9.1 U9.5 | length 692.3
  Top Layer w10: C54.2@4653.77,1391.38 4744.85,1391.38 ; U3.AD2@4757.35,1414.19 4757.35,1403.88 ; 4795,912 4795,962.01 ccw(c4724.58,962.01) 4774.37,1011.81 cw(c4815.48,1052.92) 4758.67,1040.59 cw(c4815.48,1052.92) 4757.35,1052.92 4757.35,1378.88 ; 4744.85,1391.38 cw(c4744.85,1378.88) 4757.35,1378.88 ; 4744.85,1391.38 ccw(c4744.85,1403.88) 4757.35,1403.88 ; 4757.35,1378.88 4757.35,1403.88
  Top Layer w20: v1(4620.33,114.72) U9.5@4620.33,164.41
  other v1: 4620.33,49.73 4620.33,82.23 4324.76,346 4358,346 4324.76,393.24 4358,393.24 4959,831.41 4808.14,863.91 4843.64,863.91 4959,863.91
VBUS-TYPEC: C63.1 FB5.1 J1.A4/B9 J1.B4/A9 U8.5 | length 265.6
  Top Layer w8: FB5.1@4902,932.37 cw(c4917.62,932.37) FB5.1@4917.62,947.99 ; U8.5@4995.42,1091.5 U8.5@4995.57,1091.65 ; J1.A4/B9@5209.5,1000.02 J1.A4/B9@5212.5,997.02
  Top Layer w16: C63.1@5122.59,997.02 v1@5162,997.02
  Top Layer w20: v1@5162,997.02 J1.A4/B9@5212.5,997.02 ; v1@5162,1185.99 J1.B4/A9@5212.5,1185.99
  Top Layer w22: v1(4948.2,1091.65) 4995.57,1091.65 U8.5@4999.78,1091.65 ; U8.5@4996.42,1091.5 v1(5041,1091.5)
  other v1: 4959,951.5 4959,984 4888.5,985.2 4923,985.2 5158,1001.02 5158,1033.52 5158,1149.49 5158,1181.98
VC_INPUT: FB3.1 J2.3 | length 1930.2
  Bottom Layer w40: FB3.1@536.52,70.08 1125.08,70.08 ccw(c1125.08,137) 1192,137 1192,371.4 cw(c1255.21,371.4) 1255.21,434.61 1706.82,434.61 cw(c1706.82,382.44) 1759,382.44 1759,17.72 cw(c1756.1,17.72) J2.3@1756.1,14.82
VC_N: C32.2 C34.2 R47.2 U1.23 | length 4285.8
  Top Layer w10: U1.23@3210.97,1264.29 3299.89,1264.29 cw(c3299.89,1253.55) 3310.63,1253.55 v1(3310.63,1151.65)
  Bottom Layer w10: C32.2@562.07,1500.82 562.07,1503.38 C32.2@552.07,1513.38 552.07,1545.39 cw(c569.84,1545.39) 569.84,1563.16 1038.94,1563.16 cw(c1038.94,1530.73) 1071.38,1530.73 1071.38,1060.39 ccw(c1122.78,1060.39) 1122.78,1008.99 3264.76,1008.99 ccw(c3264.76,1054.85) 3310.63,1054.85 v1(3310.63,1151.65) ; 582.88,1480.01 582.95,1479.93 ; 591.52,1459.16 591.52,1459.24
  Bottom Layer w20: C34.2@477.07,1513.38 C32.2@552.07,1513.38 ; C32.2@562.07,1500.82 582.88,1480.01 ; 582.95,1479.93 cw(c562.19,1459.22) 591.52,1459.24 ; 591.52,1459.16 591.52,1121.33 ccw(c687.53,1121.33) R47.2@690.77,1025.38